# Altium PCB PCB.PcbDoc (part 1 of 2)
Units mm, origin at the board's own origin, x right, y up, seen from the top; angles counter-clockwise.
Board outline 117.79 x 36.02 mm, 4 copper layers (Top Layer, Layer 1, Layer 2, Bottom Layer), stack 1.592 mm thick; 89 components, 67 nets, 364 pads, 204 vias.
Unrouted connection lines stored in the file: 24.
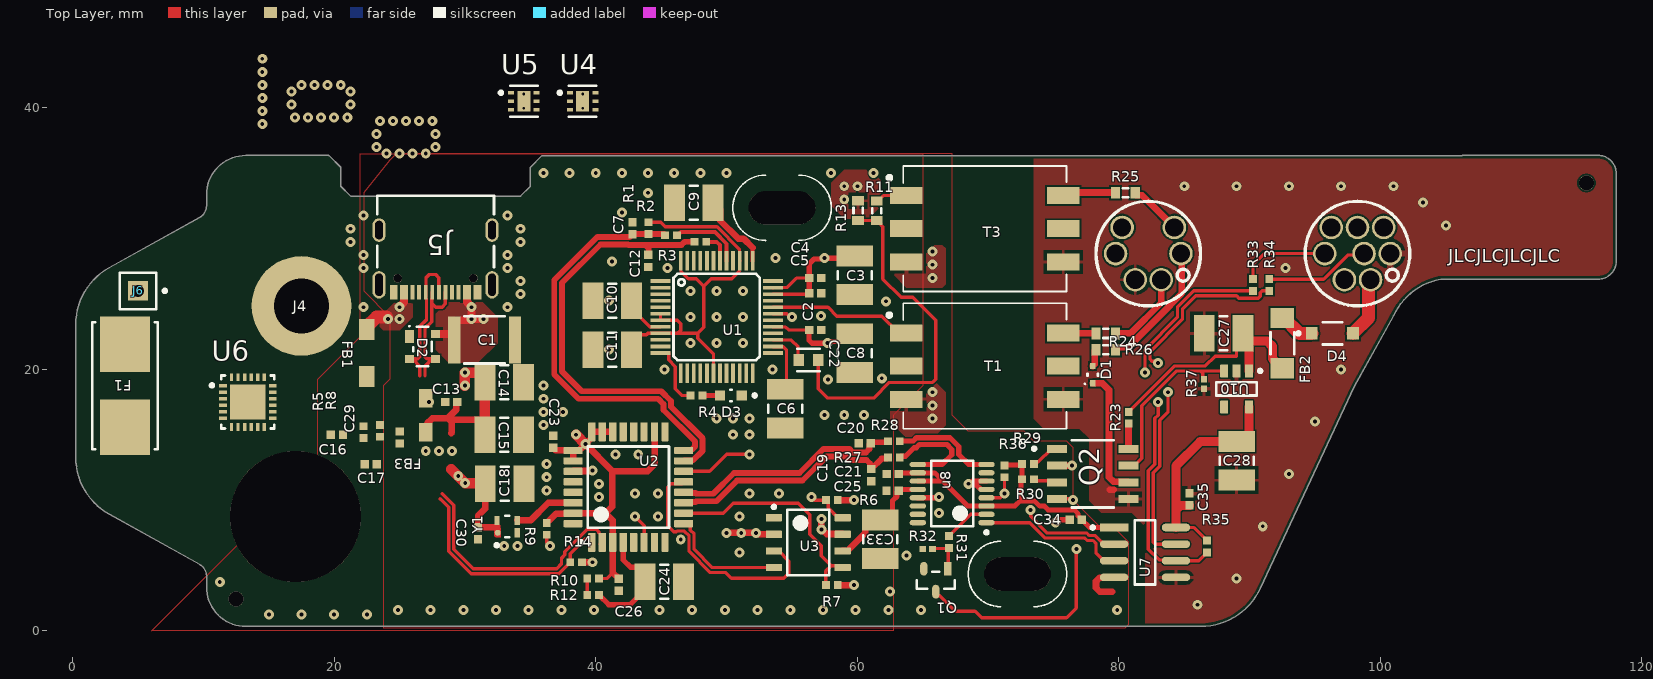
[diagram p0: Top Layer view]
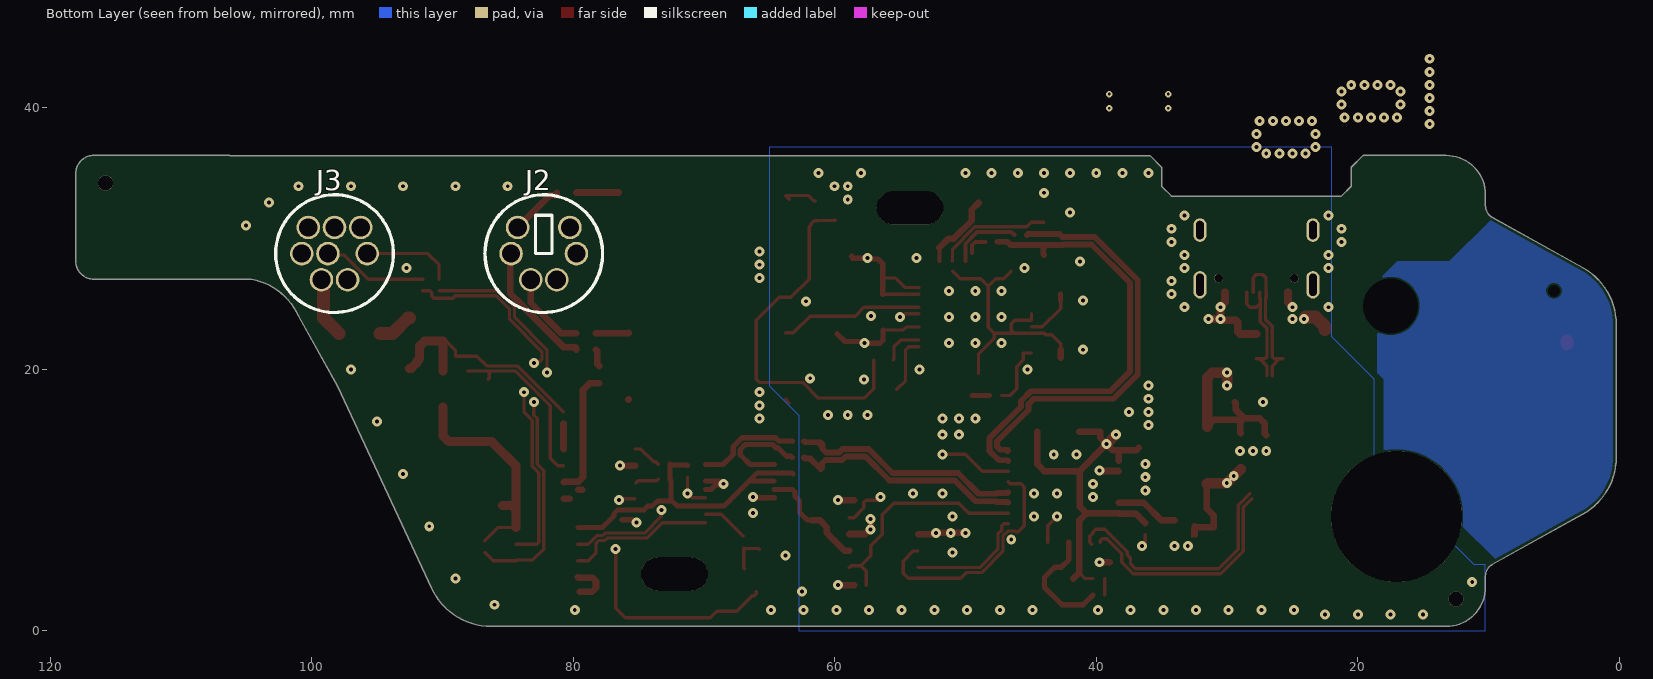
[diagram p1: Bottom Layer view, seen from below]
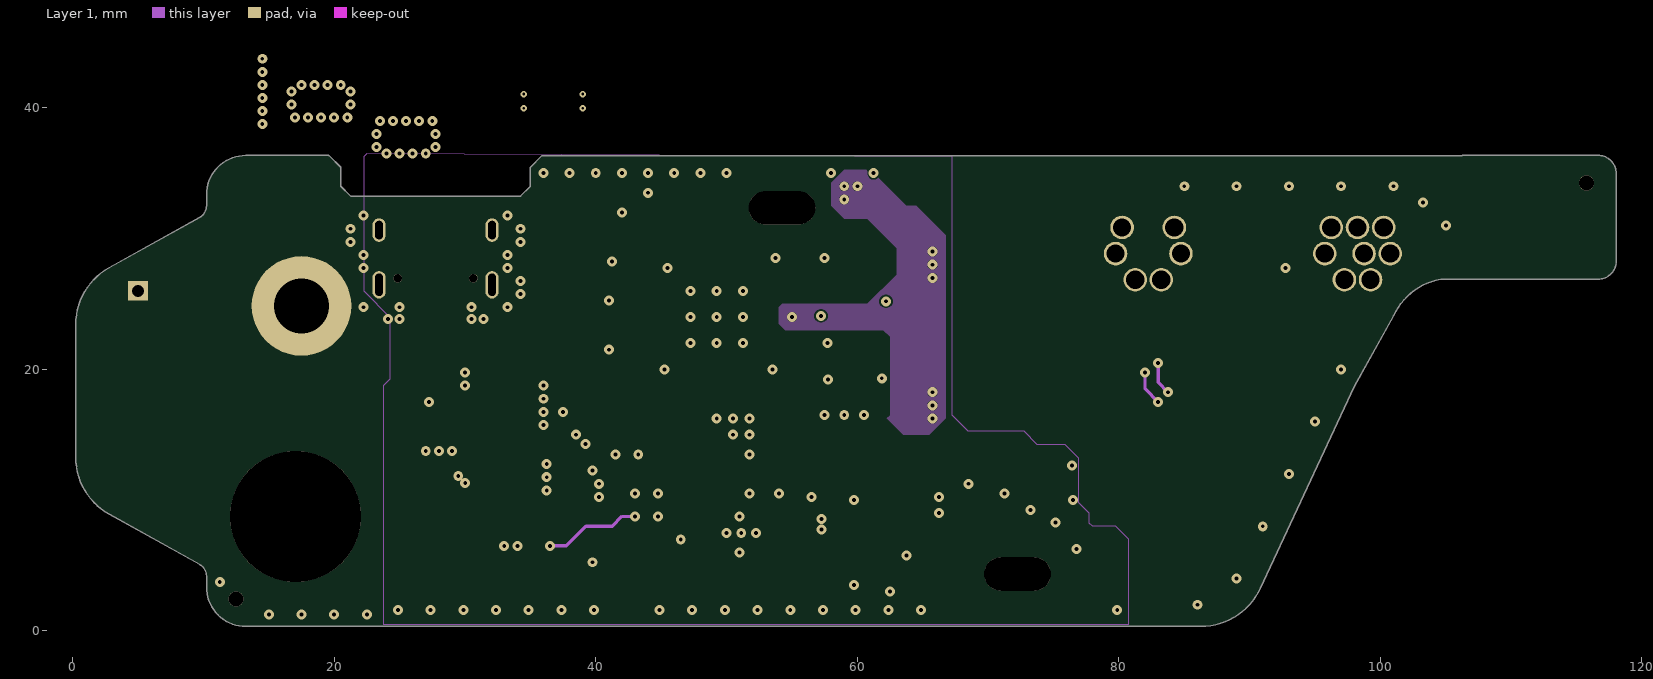
[diagram p2: Layer 1]
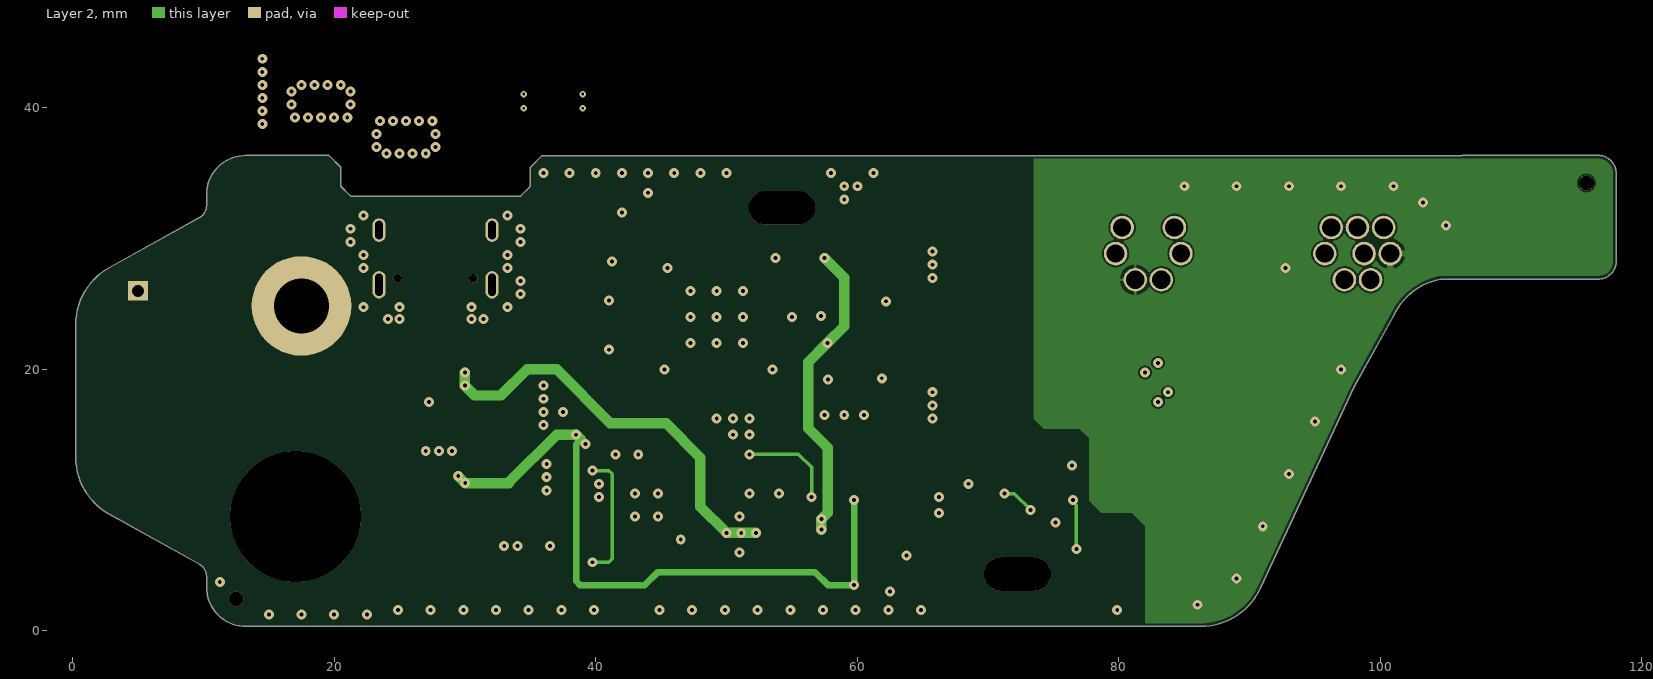
[diagram p3: Layer 2]
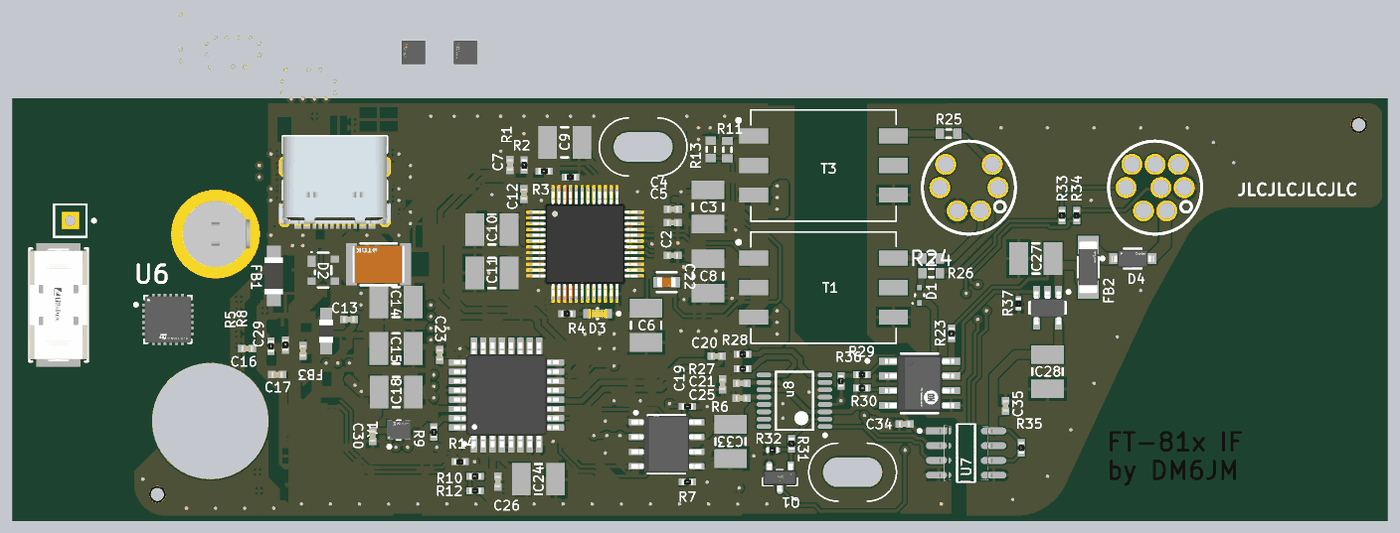
[diagram p5: 3D render of the assembled board from above, using the file's embedded part models]

## Layer stack, top to bottom
Top Solder: solder mask 0.0102, Solder Resist, Dk 3.5
Top Layer: signal copper 0.0356
PregHigher (7628*1): prepreg 0.2104, PP-006, Dk 4.4
Layer 1: signal copper 0.0175
Core: dielectric 1.065, FR-4, Dk 4.6
Layer 2: signal copper 0.0175
PregLower (7628*1): prepreg 0.2104, PP-006, Dk 4.4
Bottom Layer: signal copper 0.0356
Bottom Solder: solder mask 0.0102, Solder Resist, Dk 3.5

## Board outline
2.813,8.916 cw(c5.245,13.293) 0.238,13.293 0.238,23.409 cw(c5.245,23.409) 2.813,27.785 9.727,31.626 ccw(c9.245,32.495) 10.238,32.495 10.238,33.351 cw(c13.245,33.351) 13.245,36.357 19.601,36.357 19.601,36.351 20.5,35.451 20.5,34 21.25,33.25 34.25,33.25 35,34 35,35.451 35.899,36.351 106.245,36.351 106.251,36.357 116.643,36.357 116.643,36.364 cw(c116.643,34.983) 118.024,34.983 118.024,28.274 118.031,28.274 cw(c116.65,28.274) 116.65,26.893 104.607,26.893 ccw(c105.522,21.984) 100.996,24.094 98.002,18.675 98.008,18.672 90.81,3.235 cw(c86.272,5.351) 86.272,0.344 13.245,0.344 cw(c13.245,3.351) 10.238,3.351 10.238,4.207 ccw(c9.244,4.207) 9.727,5.075

## Design rules (kind name [scope] priority, off if disabled: settings)
BoardOutlineClearance [All] p1: gap=0.254 ignorepadtopadclearanceinfootprint=FALSE
Clearance [All] p1: gap=0.127 ignorepadtopadclearanceinfootprint=TRUE
DiffPairsRouting [InDifferentialPair('USB_EXT_D') or InDifferentialPair('USB_D')] p1: maxlimit=0.127 minlimit=0.127 mostfreqgap=0.127 toplayer_minwidth=0.261 toplayer_maxwidth=0.261 toplayer_prefwidth=0.206 midlayer1_minwidth=0.381 midlayer1_maxwidth=0.381 midlayer1_prefwidth=0.139 midlayer2_minwidth=0.381 midlayer2_maxwidth=0.381 midlayer2_prefwidth=0.139 bottomlayer_minwidth=0.261 bottomlayer_maxwidth=0.261 bottomlayer_prefwidth=0.206 impedanceprofiledriven=TRUE impedanceprofileid={2149D75C-B108-4435-8009-75143161DC46} impedanceprofilevalue=90.000000 maxuncoupledlength=12.7
DiffPairsRouting DiffPairsRouting_USB [InDifferentialPair('USB_1_D') or InDifferentialPair('USB_2_D')] p2: maxlimit=0.127 minlimit=0.127 mostfreqgap=0.127 toplayer_minwidth=0.447 toplayer_maxwidth=0.447 toplayer_prefwidth=0.244 midlayer1_minwidth=0.381 midlayer1_maxwidth=0.381 midlayer1_prefwidth=0.147 midlayer2_minwidth=0.381 midlayer2_maxwidth=0.381 midlayer2_prefwidth=0.147 bottomlayer_minwidth=0.447 bottomlayer_maxwidth=0.447 bottomlayer_prefwidth=0.244 impedanceprofiledriven=TRUE impedanceprofileid={BB3B1409-5E5B-4417-8D99-8DCBF621B1B4} impedanceprofilevalue=90.000000 maxuncoupledlength=12.7
HoleSize [All] p1: absolutevalues=TRUE maxlimit=25.4 minlimit=0.254 maxpercent=80.000 minpercent=20.000
MinimumSolderMaskSliver [All] p1: minsoldermaskwidth=0.102
PolygonConnect [All And ( Not (IsVia)) vs All And ( Not (IsVia))] p1: connectstyle=Relief reliefconductorwidth=0.254 reliefentries=4 polygonreliefangle="90 Angle" airgapwidth=0.254
RoutingVias [All] p1: holewidth=0.711 width=1.27 viastyle="Through Hole" minholewidth=0.711 minwidth=1.27 maxholewidth=0.711 maxwidth=1.27
SolderMaskExpansion [not IsVia] p1: expansion=0.102 istentingtop=FALSE
SolderMaskExpansion SolderMaskExpansion_Via [IsVia] p2: expansion=0 istentingtop=TRUE
Width Width_USB_Pwr [InNetClass('USB_Pwr')] p1: maxlimit=1 minlimit=0.254 preferedwidth=0.508
Width [All] p2: maxlimit=1 minlimit=0.254 preferedwidth=0.254
27 further rules are at their usual default settings.

## Classes and differential pairs
component class Power: F1 J4 J6 U6
component class Serial: C19 C20 C21 C25 C27 C28 C33 C34 C35 D1 D4 FB2 J3 Q1 Q2 R23 R26 R27 R28 R29 R30 R31 R32 R33 R34 R35 R36 R37 U7 u8 U10
component class USB: C1 C13 C14 C15 C16 C17 C18 C23 C24 C26 C29 C30 D2 FB1 FB3 J5 R5 R6 R7 R8 R9 R10 R12 R14 U2 U3 U4 U5 Y1
net class USB_Pwr: NetC1_2 NetC13_1 USB_3V3 VBUS1 VBUS2
net class USB_Diff: USB_1_D_N USB_1_D_P USB_2_D_N USB_2_D_P USB_D_N USB_D_P USB_EXT_D_N USB_EXT_D_P
component class Sound: C2 C3 C4 C5 C6 C7 C8 C9 C10 C11 C12 C22 D3 J2 R1 R2 R3 R4 R11 R13 R24 R25 T1 T3 U1
differential pair USB_D: +USB_D_P -USB_D_N
differential pair USB_2_D: +USB_2_D_P -USB_2_D_N
differential pair USB_1_D: +USB_1_D_P -USB_1_D_N
differential pair USB_EXT_D: +USB_EXT_D_P -USB_EXT_D_N

## Components (designator, comment, footprint, x,y, rotation, side; value= is the part's Value field where it differs from the comment)
C1 "C4532X7R3A103K200KA" FP-C4532-200-0_4-IPC_B 31.5,22.25 r180 top
C2 "100nF/50V" TORQ-CAP-0402_N 56.773,23.009 r0 top value=100nF
C3 "4.7uF 25V" CAPC1210(3225)220_M 59.817,27.187 r90 top value=4.7uF
C4 "100nF/50V" TORQ-CAP-0402_N 56.792,26.98 r0 top value=100nF
C5 "100nF/50V" TORQ-CAP-0402_N 56.779,25.829 r0 top value=100nF
C6 "4.7uF 25V" CAPC1210(3225)220_M 54.5,17 r90 top value=4.7uF
C7 "47pF/50V" TORQ-CAP-0402_N 42.806,30.8 r270 top value=47p
C8 "4.7uF 25V" CAPC1210(3225)220_M 59.817,21.246 r90 top value=4.7uF
C9 "4.7uF 25V" CAPC1210(3225)220_M 47.5,32.75 r180 top value=4.7uF
C10 "4.7uF 25V" CAPC1210(3225)220_M 41.25,25.25 r0 top value=4.7uF
C11 "4.7uF 25V" CAPC1210(3225)220_M 41.25,21.5 r0 top value=4.7uF
C12 "47pF/50V" TORQ-CAP-0402_N 44,28.29 r90 top value=47p
C13 "100nF/50V" TORQ-CAP-0402_N 28.96,17.5 r180 top value=100nF
C14 "4.7uF 25V" CAPC1210(3225)220_M 33,19 r180 top value=4.7uF
C15 "4.7uF 25V" CAPC1210(3225)220_M 33,15 r180 top value=4.7uF
C16 "47pF/50V" TORQ-CAP-0402_N 20.21,15 r180 top value=47p
C17 "47pF/50V" TORQ-CAP-0402_N 22.79,12.75 r0 top value=47p
C18 "4.7uF 25V" CAPC1210(3225)220_M 33.025,11.25 r180 top value=4.7uF
C19 "47pF/50V" TORQ-CAP-0402_N 61.06,11.915 r90 top value=47p
C20 "47pF/50V" TORQ-CAP-0402_N 60.557,14.336 r0 top value=47p
C21 "100nF/50V" TORQ-CAP-0402_N 62.71,12 r0 top value=100nF
C22 "CC0603KRX7R9BB105" FP-CC0603-DB-MFG 56.262,20.714 r180 top
C23 "100nF/50V" TORQ-CAP-0402_N 36.75,14.46 r90 top value=100nF
C24 "4.7uF 25V" CAPC1210(3225)220_M 45.25,3.75 r180 top value=4.7uF
C25 "100nF/50V" TORQ-CAP-0402_N 62.695,10.722 r0 top value=100nF
C26 "100nF/50V" TORQ-CAP-0402_N 41.75,3.54 r270 top value=100nF
C27 "4.7uF 25V" CAPC1210(3225)220_M 88,22.75 r180 top value=4.7uF
C28 "4.7uF 25V" CAPC1210(3225)220_M 89,13 r270 top value=4.7uF
C29 "100nF/50V" TORQ-CAP-0402_N 25,14.79 r270 top value=100nF
C30 "100nF/50V" TORQ-CAP-0402_N 31,7.46 r270 top value=100nF
C33 "4.7uF 25V" CAPC1210(3225)220_M 61.75,7 r270 top value=4.7uF
C34 "100nF/50V" TORQ-CAP-0402_N 76.71,8.5 r180 top value=100nF
C35 "100nF/50V" TORQ-CAP-0402_N 85.4,10.058 r90 top value=100nF
D1 "BAT54XV2T5G" ONSC-SOD-523-2-502-01_V 78,19.59 r90 top
D2 "PRTR5V0U2X,215" NXP-SOT143B-4_V 26.75,21.75 r0 top
D3 "APT1608LZGCK" FP-APT1608LZGCK-MFG 50.325,18 r180 top
D4 "MBR0580S1-7" FP-SOD123-MFG 96.325,22.75 r0 top value=15pF
F1 "0154004.DR" FP-0154-MFG 4,18.75 r270 top
FB1 "74279221111" WE-MPSB_1206_L3.2W1.6H1.1 22.5,21.25 r270 top
FB2 "BLM41PG600SN1L" FP-BLM41-0_2-IPC_B 92.5,22 r90 top
FB3 "74279220601" WE-MPSB_0805_L2W1.2H0.9 27,16.5 r270 top
J2 "MP-371/S6" MiniDIN6_TopSolder_Lumberg 82.245,28.851 r180 bottom locked
J3 "MP-371/S8" MiniDIN8_TopSolder_Lumberg 98.245,28.851 r180 bottom locked
J4 "50-00621_THT" 50-00621_THT 17.495,24.851 r0 top locked
J5 "629722000214" 629722000214 27.75,29.5 r180 top
J6 "Inner" PIN1 5,26 r270 top
Q1 "BSS123-7-F" FP-SOT23-IPC_C 66,3.877 r270 top
Q2 "MOCD223M" FP-751DZ-MFG 78,12 r0 top
R1 "1kR5" TORQ-RES-0402-N 44.025,30.792 r90 top value=1k5
R2 "27R" TORQ-RES-0402-N 45.75,30.25 r0 top value=27
R3 "27R" TORQ-RES-0402-N 48,29.75 r0 top value=27
R4 "330R" TORQ-RES-0402-N 47.7,18 r0 top value=330
R5 "27R" TORQ-RES-0402-N 22.25,15.2 r270 top value=27
R6 "10kR" TORQ-RES-0402-N 58.05,10 r180 top value=10k
R7 "10kR" TORQ-RES-0402-N 58.05,3.5 r180 top value=10k
R8 "27R" TORQ-RES-0402-N 23.5,15.3 r270 top value=27
R9 "10kR" TORQ-RES-0402-N 36.25,7.8 r90 top value=10k
R10 "1kR5" TORQ-RES-0402-N 39.8,4 r180 top value=1k5
R11 "470R" J1-0603 61.481,32.121 r90 top
R12 "1kR5" TORQ-RES-0402-N 39.8,2.75 r0 top value=1k5
R13 "100R" J1-0603 60.06,32.141 r90 top
R14 "1kR5" TORQ-RES-0402-N 38.5,5.25 r180 top value=1k5
R23 "1kR" TORQ-RES-0402-N 80.75,16.3 r90 top value=1k
R24 "27R" J1-0603 79,22.75 r0 top
R25 "27R" J1-0603 80.5,33.5 r0 top
R26 "100R" J1-0603 79,21.5 r0 top
R27 "27R" TORQ-RES-0402-N 62.8,13.25 r0 top value=27
R28 "27R" TORQ-RES-0402-N 62.8,14.5 r0 top value=27
R29 "1kR" TORQ-RES-0402-N 73.05,12.75 r0 top value=1k
R30 "1kR" TORQ-RES-0402-N 73.053,11.593 r180 top value=1k
R31 "1kR" TORQ-RES-0402-N 67,6.8 r90 top value=1k
R32 "100K/5%" TORQ-RES-0402_L 65.375,6.25 r0 top value=100k
R33 "100R" TORQ-RES-0402-N 90.25,26.45 r90 top value=100
R34 "100R" TORQ-RES-0402-N 91.5,26.45 r90 top value=100
R35 "10kR" TORQ-RES-0402-N 86.75,6.45 r90 top value=10k
R36 "10kR" TORQ-RES-0402-N 71.25,12.2 r90 top value=10k
R37 "100K/5%" TORQ-RES-0402_L 86.5,18.875 r90 top value=100k
T1 "TTC-5023" TRANSFORMER_TTC-5023 69.75,20.25 r0 top
T3 "TTC-5023" TRANSFORMER_TTC-5023 69.75,30.75 r0 top
U1 "CM108B" TQFP48 49.25,24 r90 top
U2 "TUSB2036VF" VF0032A_N 42.5,11 r90 top
U3 "TPS2046BDR" D0008A_L 56.25,6.75 r0 top
U4 "TPS70950DRVT" FP-DRV0006A-MFG 39,40.5 r0 top
U5 "TPS70933DRVT" FP-DRV0006A-MFG 34.5,40.5 r0 top
U6 "STUSB4500QTR" FP-QFN-24-EP_4x4-MFG 13.4,17.5 r0 top
U7 "ISO7021D" FP-D0008A-IPC_B 82,6 r0 top
u8 "FT230XS" FTDI-SSOP-16_L 67.25,10.5 r180 top
U10 "TPS76333DBVT" DBV0005A_N 89,18.5 r270 top
Y1 "DSC6101MI2B-048.0000" FP-C04-C04-1200-0 33.225,7.975 r0 top

## Footprints (in the part's own frame and the unit in brackets; to place one, negate y for a bottom-side part, rotate by r counter-clockwise, add the part's x,y. Pads: shape width x height; smd on the part's side, far side on the other; paste and mask are expansions set on the pad)
50-00621_THT [mm] "Connector, dc plug, 4.0x1.7x21.3 mm, mounted as THT"
  round 7.62 / inner round 7.62 / far side round 0 hole 4.2: 1(0,0)
  body extent -2.85,-2.85 2.95,2.85, height 10.46
629722000214 [mm] "USB TYPE C VERTICAL PLUG"
  rect 0.6x1.14 smd: A1/B12(-3.2,3.605) A4/B9(-2.4,3.605) A9/B4(2.4,3.605) A12/B1(3.2,3.605)
  rect 0.3x1.14 smd: A5(-1.25,3.605) A6(-0.25,3.605) A7(0.25,3.605) A8(1.25,3.605) B5(1.75,3.605) B6(0.75,3.605) B7(-0.75,3.605) B8(-1.75,3.605)
  round 0.65 hole 0.65 unplated: MH1(-2.89,2.535) MH2(2.89,2.535)
  oval 1x2.1 hole 0.6 slot 1.7 at 90 deg: Shell(-4.32,3.035) Shell(4.32,3.035)
  oval 1x1.8 hole 0.6 slot 1.4 at 90 deg: Shell(-4.32,-1.145) Shell(4.32,-1.145)
  silkscreen extent -4.47,-3.76 4.47,1.7, body extent -4.79,-3.76 4.79,3.95, height 3.33
CAPC1210(3225)220_M [mm] "Chip Capacitor, Body 3.2x2.5mm, Height 2.2mm, IPC Low Density"
  rect 1.6x2.8 smd: 1(-1.475,0) 2(1.475,0)
  silkscreen extent -0.3,-1.3 0.3,1.3, body extent -1.7,-1.35 1.7,1.35, height 2.2
D0008A_L [mm] "SOIC, 8-Leads, Body 5x4mm, Pitch 1.27mm, IPC High Density"
  rrect18% 1.25x0.55 smd: 1(-2.625,1.905) 2(-2.625,0.635) 3(-2.625,-0.635) 4(-2.625,-1.905) 5(2.625,-1.905) 6(2.625,-0.635) 7(2.625,0.635) 8(2.625,1.905)
  silkscreen extent -2.75,-2.5 1.6,2.85, body extent -3,-2.45 3,2.45, height 1.63
DBV0005A_N [mm] "SOT23, 5-Leads, Body 3.05x1.75mm, Pitch 0.95mm, IPC Medium Density"
  rrect17% 1x0.6 smd: 1(-1.375,0.95) 2(-1.375,0) 3(-1.375,-0.95) 4(1.375,-0.95) 5(1.375,0.95)
  silkscreen extent -1.5,-1.55 0.5,1.93, body extent -1.42,-1.46 1.42,1.46, height 1.08
FP-0154-MFG [mm]
  rect 4.24x3.81 smd paste+0 mask+0: 1(-3.185,0) 2(3.185,0)
  silkscreen extent -4.86,-2.51 4.86,2.51, body extent -5.41,-2.62 5.41,2.62, height 0.25
FP-751DZ-MFG [mm]
  rect 1.52x0.61 smd paste+0 mask+0: 1(-2.73,1.905) 2(-2.73,0.635) 3(-2.73,-0.635) 4(-2.73,-1.905) 5(2.73,-1.905) 6(2.73,-0.635) 7(2.73,0.635) 8(2.73,1.905)
  silkscreen extent -4.6,-2.57 1.6,2.57, body extent -3.59,-2.67 3.59,2.67, height 0.25
FP-APT1608LZGCK-MFG [mm]
  rect 0.8x0.8 smd paste+0 mask+0: 1(-0.825,0) 2(0.825,0)
  silkscreen extent -1.95,-0.45 0.05,0.45, body extent -1.33,-0.55 1.33,0.55, height 0.25
FP-BLM41-0_2-IPC_B [mm]
  rect 1.554x1.806 smd paste+0 mask+0: 1(-1.926,0) 2(1.926,0)
  silkscreen extent -0.85,-0.9 0.85,0.9, body extent -2.95,-1.15 2.95,1.15, height 0.25
FP-C04-C04-1200-0 [mm]
  round 0.45 smd paste+0 mask+0: 1(-0.725,-0.475)
  rect 0.4x0.7 smd paste+0 mask+0: 2(0.775,-0.475) 3(0.775,0.475) 4(-0.775,0.475)
  Top Layer region: -0.975,-0.125 -0.475,-0.125 -0.475,-0.825 -0.883,-0.825 -0.975,-0.733
  silkscreen extent -0.92,-1.55 0.15,0.82, body extent -1.53,-1.33 1.53,1.33, height 0.25
FP-C4532-200-0_4-IPC_B [mm]
  rect 0.953x3.603 smd paste+0 mask+0: 1(-2.325,0) 2(2.325,0)
  silkscreen extent -1.55,-1.8 1.55,1.8, body extent -3.05,-2.05 3.05,2.05, height 0.25
FP-CC0603-DB-MFG [mm]
  rect 0.8x0.9 smd paste+0 mask+0: 1(-0.75,0) 2(0.75,0)
  silkscreen extent -0.85,-0.85 0.85,0.85, body extent -1.43,-0.82 1.43,0.82, height 0.25
FP-D0008A-IPC_B [mm]
  rect 2.169x0.582 smd paste+0 mask+0: 1(-2.364,1.905)
  rrect100% 2.169x0.582 smd paste+0 mask+0: 2(-2.364,0.635) 3(-2.364,-0.635) 4(-2.364,-1.905) 5(2.364,-1.905) 6(2.364,-0.635) 7(2.364,0.635) 8(2.364,1.905)
  silkscreen extent -4.12,-2.45 0.78,2.45, body extent -3.7,-2.7 3.7,2.7, height 0.25
FP-DRV0006A-MFG [mm]
  rrect33% 0.45x0.3 smd paste+0 mask+0: 1(-0.975,0.65) 2(-0.975,0) 3(-0.975,-0.65) 4(0.975,-0.65) 5(0.975,0) 6(0.975,0.65)
  rrect10% 1x1.6 smd paste-1000 mask+0: 7(0,0)
  silkscreen extent -1.87,-1.17 1.05,1.17, body extent -1.3,-1.15 1.3,1.15, height 0.25
FP-QFN-24-EP_4x4-MFG [mm]
  rect 0.6x0.25 smd paste+0 mask+0: 1(-1.9,1.25) 2(-1.9,0.75) 3(-1.9,0.25) 4(-1.9,-0.25) 5(-1.9,-0.75) 6(-1.9,-1.25) 13(1.9,-1.25) 14(1.9,-0.75) 15(1.9,-0.25) 16(1.9,0.25) 17(1.9,0.75) 18(1.9,1.25)
  rect 0.25x0.6 smd paste+0 mask+0: 7(-1.25,-1.9) 8(-0.75,-1.9) 9(-0.25,-1.9) 10(0.25,-1.9) 11(0.75,-1.9) 12(1.25,-1.9) 19(1.25,1.9) 20(0.75,1.9) 21(0.25,1.9) 22(-0.25,1.9) 23(-0.75,1.9) 24(-1.25,1.9)
  rect 2.7x2.7 smd paste+0 mask+0: 25(0,0)
  silkscreen extent -2.87,-2.02 2.02,2.02, body extent -2.3,-2.3 2.3,2.3, height 0.25
FP-SOD123-MFG [mm]
  rect 0.9x0.95 smd paste+0 mask+0: 1(-1.575,0) 2(1.575,0)
  silkscreen extent -2.72,-0.85 0.75,0.85, body extent -2.12,-0.95 2.12,0.95, height 0.25
FP-SOT23-IPC_C [mm]
  rect 1.059x0.547 smd paste+0 mask+0: 1(-0.877,0.915)
  rrect100% 1.059x0.547 smd paste+0 mask+0: 2(-0.877,-0.915) 3(0.877,0)
  silkscreen extent -0.65,-1.45 0.65,1.45, body extent -1.51,-1.55 1.51,1.55, height 0.25
FTDI-SSOP-16_L [mm] "SOP, 16-Leads, Body 5x4mm, Pitch 0.635mm, IPC High Density"
  oval 1.25x0.4 smd: 1(-2.625,2.222) 2(-2.625,1.587) 3(-2.625,0.952) 4(-2.625,0.317) 5(-2.625,-0.318) 6(-2.625,-0.953) 7(-2.625,-1.588) 8(-2.625,-2.223) 9(2.625,-2.222) 10(2.625,-1.587) 11(2.625,-0.952) 12(2.625,-0.317) 13(2.625,0.318) 14(2.625,0.953) 15(2.625,1.588) 16(2.625,2.223)
  silkscreen extent -2.75,-2.5 1.6,3.1, body extent -2,-2.5 2,2.5, height 1.76
J1-0603 [mm] "Chip Resistor, Body 1.6x0.8mm, IPC High Density"
  rect 0.7x0.9 smd: 1(-0.75,0) 2(0.75,0)
  silkscreen extent -0.2,-0.35 0.2,0.35, body extent -0.85,-0.48 0.85,0.48, height 0.9
MiniDIN6_TopSolder_Lumberg [mm] "Inner part of a lumberg MP-371 connector soldered directly on PCB"
  round 1.8 hole 1.4: 1(-1,-2) 2(1,-2) 3(-2.5,0) 4(2.5,0) 5(-2,2) 6(2,2)
  silkscreen extent -4.5,-4.5 4.5,4.5, body extent -4.5,-4.5 4.5,4.5, height 5
MiniDIN8_TopSolder_Lumberg [mm] "Inner part of a lumberg MP-371 connector soldered directly on PCB"
  round 1.8 hole 1.4: 1(-1,-2) 2(1,-2) 3(-2.5,0) 4(-0.5,0) 5(2.5,0) 6(-2,2) 7(0,2) 8(2,2)
  silkscreen extent -4.5,-4.5 4.5,4.5, body extent -4.5,-4.5 4.5,4.5, height 5
NXP-SOT143B-4_V [mm] "SOT143, 4-Leads, Body 3x1.4mm"
  rect 0.7x1 smd: 1(-1,0.75)
  rect 0.7x0.6 smd: 2(-1,-0.95) 3(1,-0.95) 4(1,0.95)
  silkscreen extent -1.05,-1.5 0.7,1.6, body extent -0.7,-1.5 0.7,1.5, height 1.1
ONSC-SOD-523-2-502-01_V [mm] "SOD, 2-Leads, Body 1.2x0.8mm"
  rect 0.48x0.4 smd: 1(-0.66,0) 2(0.66,0)
  silkscreen extent -0.75,-0.4 0.07,0.65, body extent -0.6,-0.4 0.6,0.4, height 0.7
PIN1 [mm] "Connector; Plug"
  rect 1.5x1.5 / inner rect 1.5x1.5 / far side rect 0x0 hole 0.9: 1(0,0)
  silkscreen extent -1.4,-1.4 1.4,2.18
TORQ-CAP-0402_N [mm] "Chip Capacitor, 2-Leads, Body 1.00x0.50mm, IPC Medium Density"
  rect 0.64x0.64 smd: 1(-0.46,0) 2(0.46,0)
  body extent -0.5,-0.25 0.5,0.25, height 0.5
TORQ-RES-0402-N [mm] "Resistor - 0402 - 2-Leads - Body 1.00x0.50mm - Medium Density"
  rect 0.6x0.6 smd: 1(-0.45,0) 2(0.45,0)
  body extent -0.5,-0.25 0.5,0.25, height 0.35
TORQ-RES-0402_L [mm] "Chip Resistor, 2-Leads, Body 1.00x0.50mm, IPC High Density"
  rect 0.5x0.45 smd: 1(-0.375,0) 2(0.375,0)
  body extent -0.5,-0.25 0.5,0.25, height 0.35
TQFP48 [mm]
  rect 0.28x1.5 smd paste-2: 1(2.75,4.3) 2(2.25,4.3) 3(1.75,4.3) 4(1.25,4.3) 5(0.75,4.3) 6(0.25,4.3) 7(-0.25,4.3) 8(-0.75,4.3) 9(-1.25,4.3) 10(-1.75,4.3) 11(-2.25,4.3) 12(-2.75,4.3) 25(-2.75,-4.3) 26(-2.25,-4.3) 27(-1.75,-4.3) 28(-1.25,-4.3) 29(-0.75,-4.3) 30(-0.25,-4.3) 31(0.25,-4.3) 32(0.75,-4.3) 33(1.25,-4.3) 34(1.75,-4.3) 35(2.25,-4.3) 36(2.75,-4.3)
  rect 1.5x0.28 smd paste-2: 13(-4.3,2.75) 14(-4.3,2.25) 15(-4.3,1.75) 16(-4.3,1.25) 17(-4.3,0.75) 18(-4.3,0.25) 19(-4.3,-0.25) 20(-4.3,-0.75) 21(-4.3,-1.25) 22(-4.3,-1.75) 23(-4.3,-2.25) 24(-4.3,-2.75) 37(4.3,-2.75) 38(4.3,-2.25) 39(4.3,-1.75) 40(4.3,-1.25) 41(4.3,-0.75) 42(4.3,-0.25) 43(4.3,0.25) 44(4.3,0.75) 45(4.3,1.25) 46(4.3,1.75) 47(4.3,2.25) 48(4.3,2.75)
  silkscreen extent -3.3,-3.3 3.3,3.3, body extent -4.5,-4.5 4.5,4.5, height 1.5
TRANSFORMER_TTC-5023 [mm]
  rect 2.5x1.3 smd: 1(-6,2.54) 2(-6,0) 3(-6,-2.54) 4(6,-2.54) 5(6,0) 6(6,2.54)
  silkscreen extent -7.44,-4.8 6.25,4.8, body extent -6.25,-4.8 6.25,4.8, height 7.6
VF0032A_N [mm] "QFP, 32-Leads, Body 7x7mm, Pitch 0.8mm, IPC Medium Density"
  rrect18% 1.45x0.55 smd: 1(-4.225,2.8) 2(-4.225,2) 3(-4.225,1.2) 4(-4.225,0.4) 5(-4.225,-0.4) 6(-4.225,-1.2) 7(-4.225,-2) 8(-4.225,-2.8) 17(4.225,-2.8) 18(4.225,-2) 19(4.225,-1.2) 20(4.225,-0.4) 21(4.225,0.4) 22(4.225,1.2) 23(4.225,2) 24(4.225,2.8)
  rrect18% 0.55x1.45 smd: 9(-2.8,-4.225) 10(-2,-4.225) 11(-1.2,-4.225) 12(-0.4,-4.225) 13(0.4,-4.225) 14(1.2,-4.225) 15(2,-4.225) 16(2.8,-4.225) 25(2.8,4.225) 26(2,4.225) 27(1.2,4.225) 28(0.4,4.225) 29(-0.4,4.225) 30(-1.2,4.225) 31(-2,4.225) 32(-2.8,4.225)
  silkscreen extent -4.35,-3.1 3.1,3.75, body extent -4.51,-4.51 4.51,4.51, height 1.6
WE-MPSB_0805_L2W1.2H0.9 [mm] "SMD EMI Multilayer Power Suppression Bead, body 2.00x1.20mm"
  rect 1.4x1 smd: 1(-1.3,0) 2(1.3,0)
  body extent -1,-0.6 1,0.6, height 0.9
WE-MPSB_1206_L3.2W1.6H1.1 [mm] "SMD EMI Multilayer Power Suppression Bead, body 3.20x1.60mm"
  rect 1.6x1.2 smd: 1(-1.8,0) 2(1.8,0)
  body extent -1.6,-0.8 1.6,0.8, height 1.1

## Part data
C1: library part CMP-08246-006993-1, "Multilayer Ceramic Capacitors 10nF ±10% 1000V X7R SMD 1812", Capacitance=10nF, Case Code (Imperial)=1812, Case Code (Metric)=4532, Dielectric=X7R, JLCPCBPartNum=C577346, Max Operating Temperature=125°C, Min Operating Temperature=-55°C, Package Quantity=1, Resistor Type=Ceramic, Tolerance=10%, Voltage Rating=1kV, Case/Package=1812, Depth=3.2mm, Lead Free="Lead Free", Length=4.5mm, Mount="Surface Mount", Number of Pins=2, Packaging="Tape and Reel", REACH SVHC="No SVHC", RoHS Compliant=Yes, Series=C, Termination=SMD/SMT, Thickness=0.087inch, Voltage Rating (DC)=1kV, Weight=0.000952oz, Width=0.126inch
C2 C4 C5 C13 C21 C23 C25 C26 C29 C30 C34 C35: library part CMP-001-00105-22, "Capacity - 100nF - 50V - X7R - 10% - 0402 - -40°C to 125°C", JLCPCBPartNum=C432917, Man-.Bonding=No
C3 C6 C8 C9 C10 C11 C14 C15 C18 C24 C27 C28 C33: library part CMP-1038-02151-2, "CAP 4.7uF 25V ±10% 1210 (3225 Metric) Thickness 2.2mm SMD", Case-EIA=1210, Case-Metric=3225, JLCPCBPartNum=C86052, Rated Voltage="25 V", Tolerance=Â±10%, Max Thickness="2.2 mm", Technology=SMT
C7 C12 C16 C17 C19 C20: library part CMP-001-00105-22, "Capacity - 47pF - 50V - NP0 - 1% - 0402 - -40°C to 125°C", JLCPCBPartNum=C277503, Man-.Bonding=No
C22: library part CMP-03422-000761-2, "CAP CER 1UF 50V X7R 0603", Capacitance=1uF, Case Code (Imperial)=0603, Case Code (Metric)=1608, Dielectric=X7R, JLCPCBPartNum=C559769, Max Operating Temperature=125°C, Min Operating Temperature=-55°C, Package Quantity=4000, Resistor Type=Ceramic, Tolerance=10%, Voltage Rating=50V, Case/Package=0603, Halogen Free="Halogen Free", Lead Free="Lead Free", Length=0.063inch, Mount="Surface Mount", Packaging="Tape and Reel", Termination=SMD/SMT, Thickness=0.035inch, Voltage Rating (DC)=50V, Weight=7.1E-05oz, Width=0.031inch
D1: library part CMP-1055-00490-1, "Schottky Barrier Diode, 2-Pin SOD-523, Pb-Free, Tape and Reel", JLCPCBPartNum=C146759, Manufacturer="On Semiconductor", ComponentLink1Description="Manufacturer URL", ComponentLink1URL=http://www.onsemi.com/, ComponentLink2Description=Datasheet, ComponentLink2URL=http://www.onsemi.cn/pub_link/Collateral/BAT54XV2T1-D.PDF, ComponentLink3Description="Package Specification", ComponentLink3URL=http://www.onsemi.com/pub_link/Collateral/502-01.PDF, Configuration=Single, DatasheetVersion="Rev. 8", IFSM Max (A)=0.6, Mounting Technology="Surface Mount", PackageDescription="2-Pin SOD, Body 1.2 x 0.8 mm", PackageReference=SOD-523-2-502-01, PackageVersion="Rev. E, 09/2010", Packing="Tape and Reel", PartNumber=BAT54XV2T5G, RoHS=TRUE, trr Max (ns)=5
D2: library part CMP-2000-05285-1, "Ultra Low Capacitance Double Rail-to-Rail ESD Protection Diode, 5.5 V, 1 pF, -40 to 85 degC, 4-Pin SOT143B, RoHS, Tape and Reel", Capacitance Value=16pF, ESD Protection Voltage=8KV@ContactDisc, JLCPCBPartNum=C12333, Leakage Current=0.1uA, Manufacturer="NXP Semiconductors", Operating Temp Range=-40Cto85C, Operating Temperature Classification=Industrial, Operating Temperature Max Deg. C=85C, Operating Temperature Min Deg. C=-40C, Package / Case=SOT, Reverse Breakdown Voltage=6V, Reverse Stand-off Voltage=5.5V, Configuration=Quad, Datasheet URL=https://datasheet.ciiva.com/4479/prtr5v0u2x-102853-4479461.pdf, Datasheet Version="Rev. 02, 01/2008", Direction Type=Uni-Directional, Leakage Current (Max)=0.1uA, Manufacturer URL=http://www.nxp.com/, Mounting=SurfaceMount, Mounting Style=SurfaceMount, Number of Elements=1, Package Type=SOT, Packaging=TapeandReel, Pin Count=3+Tab, Polarity=Uni-Directional, Product Depth (mm)=1.4mm, Product Height (mm)=1mm, Product Length (mm)=3mm, Rad Hardened=No, Suppressor Type=DiodeArrays, Working Voltage=5.5V, Working Voltage (Max)=5.5V
D3: library part CMP-44529-000040-1, "LED GREEN CLEAR 2SMD", Case Code (Imperial)=0603, Case Code (Metric)=1608, Color=Green, Forward Voltage=2.65V, JLCPCBPartNum=C1322302, Lens Color=Colorless, Test Current=2mA, Case/Package=0603, Dominant Wavelength=525nm, Height=0.75mm, Length=1.6mm, Lens Transparency=Clear, Luminous Intensity=50mcd, Mount="Surface Mount", Packaging="Cut Tape", Viewing Angle=120°, Width=0.8mm
D4: library part CMP-12790-000046-1, "DIODE SCHOTTKY 80V 500MA SOD123", Capacitance=15pF, Forward Current=0.5A, JLCPCBPartNum=C177047, Manufacturer=Diodes, Max Junction Temp=+175°C, Max Repetitive Reverse Voltage=80V, Max Surge Forward Current=14A, Package=SOD123, Peak Reverse Current=0.5uA, Temperature="-55°C to +175°C", Temperature Range Low=-55°C, Automotive=No, Category=Diode, ComponentLink2Description=Datasheet, ComponentLink2URL=https://www.diodes.com/assets/Datasheets/MBR0580S1.pdf, Device Class L1="Discrete Semiconductors", Device Class L2=Diodes, Device Class L3="Schottky Diodes", Digikey Description="DIODE SCHOTTKY 80V 500MA SOD123", Footprint Url=https://www.diodes.com/assets/Package-Files/SOD123.pdf, Height=1.45mm, Lead Free=Yes, Manufacturer Part Number=MBR0580S1-7, Mouser Description="Schottky Diodes & Rectifiers SBR 0.5A 80Vrrm 14A Ifsm 80Vrrm 15pF", Octopart=https://octopart.com/mbr0580s1-7-diodes+inc.-53081572, Reverse Voltage=80V, RoHS=TRUE, Standoff Height=0mm, Temperature Range High=+175°C
F1: library part CMP-08605-000003-1, "FUSE BRD MNT 4A 125VAC/VDC 2SMD", Fuse Current=4A, JLCPCBPartNum=C206914, Manufacturer=Littelfuse, Max Fuse Ac Voltage=125V, Package=0154, Temperature="-55°C to +125°C", Temperature Range High=+125°C, Temperature Range Low=-55°C, Automotive=No, Category=Fuse, ComponentLink2Description=Datasheet, ComponentLink2URL=https://www.littelfuse.com/~/media/electronics/datasheets/fuses/littelfuse_fuse_154_154t_154l_154tl_datasheet.pdf.pdf, Device Class L1="Circuit Protection", Device Class L2=Fuses, Device Class L3=unset, Digikey Description="FUSE BRD MNT 4A 125VAC/VDC 2SMD", Fuse Blow Speed=Fast, Height=3.81mm, Lead Free=Yes, Manufacturer Part Number=0154004.DR, Max Fuse Dc Voltage=125V, Mouser Description="Surface Mount Fuses Fuseblock w/ fuse 4A OMNI BLOK 154", Octopart=https://octopart.com/0154004.dr-littelfuse-565861, RoHS=TRUE
FB1: library part CMP-03913-52738344-1, "74279221111 Ferrite Beads Multi-Layer High Current 110Ohm 25% 100MHz 5.4A 0.015Ohm DCR 1206 T/R", Case Code (Imperial)=1206, Case Code (Metric)=3216, Current Rating=5.4A, DC Resistance (DCR)=9.5mΩ, Max Operating Temperature=125°C, Min Operating Temperature=-55°C, Resistance=15mΩ, Test Frequency=100MHz, Tolerance=25%, Case/Package=1206, Height=1.1mm, Impedance=110Ω, Length=3.2mm, Max Current Rating=5.4A, Max DC Current=5.4A, Mount="Surface Mount", NexarPartId=52738344, Number of Lines=1, Packaging="Tape & Reel (TR)", REACH SVHC=Unknown, RoHS=Compliant, Termination=SMD/SMT, Weight=10.007382mg, Width=1.6mm
FB2: library part CMP-0686-00754-3, "Ferrite Bead, 1806, 60Ω @ 100MHz, 0.009Ω, 6A", Case Code (Imperial)=1806, Case Code (Metric)=4516, Current=6A, DC Resistance (DCR)=9mR, Frequency=100MHz, Inductor Type="FERRITE BEAD", JLCPCBPartNum=C85844, Manufacturer Series=BLM41P, Max Operating Temperature=125°C, Min Operating Temperature=-55°C, Package Quantity=1, Tolerance=25%, Case/Package=1806, Contact Plating=Tin, Core Material=Ferrite, Current Rating=6A, DC Current=6A, DC Resistance-Max=9mR, Depth=1.6mm, Height=1.6mm, Impedance=60R, Lead Free="Lead Free", Length=4.5mm, Material=Ferrite, Max Current Rating=6A, Max DC Current=6A, Military Standard=Not, Number of Circuits=1, Number of Functions=1, Number of Lines=1, Number of Pins=2, Packaging="Tape and Reel", Radiation Hardening=No, REACH SVHC="No SVHC", RoHS Compliant=Yes, Series=BLM41P, Shielding=Unshielded, Terminal Finish=Tin, Termination=SMD/SMT, Test Frequency=100MHz, Width=1.6mm
FB3: library part CMP-03913-52738340-1, "74279220601 Ferrite Beads Multi-Layer High Current 600Ohm 25% 100MHz 2.1A 0.08Ohm DCR 0805 Automotive T/R", Case Code (Imperial)=0805, Case Code (Metric)=2012, Current Rating=2.1A, DC Resistance (DCR)=43mΩ, Max Operating Temperature=125°C, Min Operating Temperature=-55°C, Test Frequency=100MHz, Tolerance=25%, Case/Package=0805, Height=900µm, Impedance=600Ω, Length=2mm, Max Current Rating=2.1A, Max DC Current=2.1A, Mount="Surface Mount", NexarPartId=52738340, Number of Lines=1, Packaging="Tape & Reel (TR)", REACH SVHC=Unknown, RoHS=Compliant, Termination=SMD/SMT, Weight=5.499807mg, Width=1.2mm
J2: library part MiniDin6_SMT, "Miniature circular connectors MP-371/S6", Digikey_PartNum=2057-MDP-006-ND
J3: library part MiniDin8_SMT, "Miniature circular connectors MP-371/S8", Digikey_PartNum=2057-MDP-008-ND
J4: library part 50-00621, "Tensility Connector, dc plug, 4.0x1.7x21.3 mm, dual solder tabs, spring contacts, nickel plated, 105 °C"
J5: library part CMP-207978-000003-2, "Conenctor USB 2.0 Type C Horizontal SMT", Current Rating=5A, Insulation Resistance=100MΩ, Max Operating Temperature=85°C, Min Operating Temperature=-40°C, Voltage Rating=20V, Contact Material="Gold, Nickel", Gender=Receptacle, Height=3.51mm, NexarPartId=129483980, Number of Contacts=12, Number of Pins=16, Packaging="Tape and Reel", Pin Length=950µm, RoHS=Compliant, USB Standard="USB 2.0"
J6: library part Socket, "Socket", LatestRevisionDate=17-Jul-2002, LatestRevisionNote="Re-released for DXP Platform.", Publisher="Altium Limited"
Q1: library part CMP-12801-000017-1, "MOSFET N-CH 100V 170MA SOT23-3", Continuous Drain Current=170mA, Drain To Source Breakdown Voltage=100V, Drain To Source Resistance=6Ω, Gate To Source Voltage=20V, Input Capacitace At Vds="22pF @ 25V", JLCPCBPartNum=C85107, Manufacturer="Diodes Incorporated", Max Forward Diode Voltage=1.3V, Max Junction Temp=+150°C, Package=SOT23, Power Dissipation=300mW, Pulse Drain Current=680mA, Temperature="-55°C to +150°C", Temperature Range Low=-55°C, Typ Forward Diode Voltage=0.84V, Automotive=No, Automotive Grade=NA, Category=Trans, ComponentLink2Description=Datasheet, ComponentLink2URL=https://www.diodes.com/assets/Datasheets/ds30366.pdf, Depletion Mode=False, Device Class L1="Discrete Semiconductors", Device Class L2=Transistors, Device Class L3=MOSFETs, Digikey Description="MOSFET N-CH 100V 170MA SOT23-3", Drain To Source Voltage=100V, Footprint Url=https://www.diodes.com/assets/Package-Files/SOT23.pdf, Height=1.1mm, Lead Free=Yes, Manufacturer Part Number=BSS123-7-F, Mouser Description="MOSFET 100V 360mW", Number Of Channels=1, Number Of N Channels=1, Octopart=https://octopart.com/bss123-7-f-diodes+inc.-335886, RoHS=TRUE, Rthja Max=417°C/W, Standoff Height=0.013mm, Temperature Range High=+150°C, Threshold Vgs Max=2V, Threshold Vgs Min=0.8V, Transconductance=0.37S, Turn Off Delay Time=13ns, Turn On Delay Time=8ns
Q2: library part CMP-07144-000014-1, "OPTOISOLTR 2.5KV 2CH DARL 8SOIC", Ambient Temperature Range High=+100°C, Ambient Temperature Range Low=-40°C, Collector Emitter Voltage=30V, Emiiter Collector Voltage=7V, Forward Current=1mA, Forward Voltage=1.08V, Isolation Voltage=2500Vrms, Manufacturer="ON Semiconductor", Max Junction Temp=+125°C, Min Current Transfer Ratio=500%, Package=751DZ, Power Dissipation=240mW, Reverse Voltage=6V, Temperature="-40°C to +125°C", Automotive=No, Category=Trans, ComponentLink2Description=Datasheet, ComponentLink2URL=https://www.onsemi.com/pub/Collateral/MOCD223M-D.PDF, Device Class L1=Optoelectronics, Device Class L2=Optocouplers, Device Class L3=unset, Digikey Description="OPTOISOLTR 2.5KV 2CH DARL 8SOIC", Footprint Url=https://www.onsemi.com/pub/Collateral/751DZ.PDF, Height=3.63mm, Ipc Land Pattern Name=SOIC127P594X363-8, Lead Free=Yes, Manufacturer Part Number=MOCD223M, Mouser Description="Optocoupler DC-IN 2-CH Darlington DC-OUT 8-Pin SOIC N Box (Alt: MOCD223M)", Octopart=https://octopart.com/mocd223m-on+semiconductor-84330512, RoHS=TRUE, Standoff Height=0.08mm, Temperature Range High=+125°C, Temperature Range Low=-40°C, Turn Off Delay Time=55us, Turn On Delay Time=10us
R1 R10 R12 R14: library part CMP-009-00226-17, "Resistor - 1500R - 1% - 50V - 62.5mW - 0402 - 100ppm - -40°C to 125°C", JLCPCBPartNum=C114759, Man-.Bonding=nein
R2 R3 R5 R8 R27 R28: library part CMP-009-00226-17, "Resistor - 27R - 1% - 50V - 62.5mW - 0402 - 100ppm - -40°C to 125°C", JLCPCBPartNum=C138021, Man-.Bonding=nein
R4: library part CMP-009-00226-17, "Resistor - 330R - 1% - 50V - 62.5mW - 0402 - 100ppm - -40°C to 125°C", JLCPCBPartNum=C105875, Man-.Bonding=nein
R6 R7 R9 R35 R36: library part CMP-009-00221-17, "Resistor - 10kR - 1% - 50V - 62.5mW - 100ppm - 0402 - -40°C to 125°C", JLCPCBPartNum=C144807, Man-.Bonding=no
R11: library part Res3, "Resistor", JLCPCBPartNum=C25804, LatestRevisionDate=29-May-2009, LatestRevisionNote="IPC-7351 Footprint Added.", PackageDescription="Chip Resistor", PackageReference=J1-0603, Published=8-Jun-2000, Publisher="Altium Limited"
R13 R26: library part Res3, "Resistor", JLCPCBPartNum=C22775, LatestRevisionDate=29-May-2009, LatestRevisionNote="IPC-7351 Footprint Added.", PackageDescription="Chip Resistor", PackageReference=J1-0603, Published=8-Jun-2000, Publisher="Altium Limited"
R23 R29 R30 R31: library part CMP-009-00209-21, "Resistor - 1kR - 1% - 50V - 62.5mW - 0402 - 100ppm - -40°C to 125°C", JLCPCBPartNum=C11702, Man-.Bonding=nein
R24 R25: library part Res3, "Resistor", JLCPCBPartNum=C192531, LatestRevisionDate=29-May-2009, LatestRevisionNote="IPC-7351 Footprint Added.", PackageDescription="Chip Resistor", PackageReference=J1-0603, Published=8-Jun-2000, Publisher="Altium Limited"
R32 R37: library part CMP-009-00211-15, "Resistor - 100k - 5% - 50V -62,5mW - 0402 - 200ppm - -55°C to 155°C", JLCPCBPartNum=C60491, Man-.Bonding=no
R33 R34: library part CMP-009-00226-17, "Resistor - 100R - 1% - 50V - 62.5mW - 0402 - 100ppm - -40°C to 125°C", JLCPCBPartNum=C106232, Man-.Bonding=nein
T1 T3: library part CMP-012-00000-1, "600 Impedance Primary Ohms 600 Impedance Secondary Ohms 1:1 Audio Transformer 200Hz ~ 4kHz Surface Mount", Case/Package=Tamura, JLCPCBPartNum=C840532, Availability=Unavailable, Component Type=Standard, Design Item ID=TTC-5023, MF=Tamura, MP=TTC-5023, Pins=4, Price=None, SnapEDA_Link=https://www.snapeda.com/parts/TTC-5023/Tamura/view-part/2878352/?ref=snap, Source=SnapEDAsch.SchLib
U1: library part CMP-002-000000-1, "USB Audio Codec improved on CM", JLCPCBPartNum=C371347, Package=None, Availability=Unavailable, Check_prices=https://www.snapeda.com/parts/CM108B/Cmedia/view-part/424266/?ref=eda, Component Type=Interface, Design Item ID=CM108B, MF=Cmedia, MP=CM108B, Pin Count=48, Price=None, SnapEDA_Link=https://www.snapeda.com/parts/CM108B/Cmedia/view-part/424266/?ref=snap, Source=CM108B.SchLib
U2: library part CMP-0309-00077-2, "2 / 3-Port Hub for USB with Optional Serial EEPROM Interface, 3.3V, 0 to 70 degC, 32-Pin LQFP (VF), Green (RoHS & no Sb/Br)", JLCPCBPartNum=C43665, Manufacturer="Texas Instruments", Supply Voltage(s)(V)=3.3, ComponentLink1Description=Datasheet, ComponentLink1URL=http://www.ti.com/general/docs/lit/getliterature.tsp?genericPartNumber=TUSB2036&fileType=pdf, ComponentLink2Description="Package Specification", ComponentLink2URL=http://www.ti.com/litv/pdf/mtqf002b, DatasheetVersion=SLLS372E, Eco-Plan="Green (RoHS & no Sb/Br)", Integrated MCU Architecture=N/A, Mounting Technology="Surface Mount", PackageDescription="32-Pin Plastic Quad Flatpack, 7 x 7 mm Body, 0.8 mm Pitch", PackageReference=VF0032A, PackageVersion="revD, Apr-2000", PartNumber=TUSB2036VF, SubFamily="USB Hub Controller", USB Full Speed=True, USB Speed=Full
U3: library part CMP-0337-00031-2, "Current-Limited Power-Distribution Switch, 0.5 A Current Limit, -40 to 85 degC, 8-pin SOIC (D), Green (RoHS & no Sb/Br)", Continuous Current(Max)(A)=0.25, Current Limit(A)=0.5, Manufacturer="Texas Instruments", Rating=Catalog, Code_JEDEC=MS-012AA, ComponentLink1Description=Datasheet, ComponentLink1URL=http://www.ti.com/general/docs/lit/getliterature.tsp?genericPartNumber=TPS2046B&fileType=pdf, DatasheetVersion=SLVS532C, Eco-Plan="Green (RoHS & no Sb/Br)", Enable="Active Low", Mounting Technology="Surface Mount", NEMKO=TRUE, Number of Switches=2, PackageDescription="8-Pin Plastic Small Outline Integrated Circuit, 4.9 x 3.9 mm, Pitch 1.27 mm Pitch", PackageReference=D0008A, PackageVersion="revM, Jun-2011", PartNumber=TPS2046BDR, rDS(on) per FET(Typ)(mOhms)=70, UL Listed=TRUE, Vin(Max)(V)=5.5, Vin(Min)(V)=2.7
U4: library part CMP-04917-000167-1, "IC REG LINEAR 5V 150MA 6SON", Dropout Voltage=960mV, Max Input Voltage=30V, Max Operating Temperature=125°C, Max Output Current=150mA, Min Current Limit=200mA, Min Input Voltage=2.7V, Min Operating Temperature=-40°C, Nominal Output Voltage=5V, Package Quantity=250, Power Supply Rejection Ratio (PSRR)=150dB, Quiescent Current=1uA, Accuracy=2%, Contact Plating=Gold, Lead Free="Lead Free", Mount="Surface Mount", Number of Outputs=1, Number of Pins=6, Number of Regulators=1, Output Current=150mA, Output Type=Fixed, Output Voltage=5V, Packaging="Tape and Reel", Polarity=Positive, Radiation Hardening=No, REACH SVHC="No SVHC", RoHS Compliant=Yes, Weight=0.000342oz
U5: library part CMP-04917-000167-1, "IC REG LINEAR 3.3V 150MA 6SON", Dropout Voltage=960mV, Max Input Voltage=30V, Max Operating Temperature=125°C, Max Output Current=150mA, Min Current Limit=200mA, Min Input Voltage=2.7V, Min Operating Temperature=-40°C, Nominal Output Voltage=3.3V, Package Quantity=250, Power Supply Rejection Ratio (PSRR)=150dB, Quiescent Current=1uA, Accuracy=2%, Contact Plating=Gold, Lead Free="Lead Free", Mount="Surface Mount", Number of Outputs=1, Number of Pins=6, Number of Regulators=1, Output Current=150mA, Output Type=Fixed, Output Voltage=3.3V, Packaging="Tape and Reel", Polarity=Positive, Radiation Hardening=No, REACH SVHC="No SVHC", RoHS Compliant=Yes, Weight=0.000342oz
U6: library part CMP-12113-000003-1, "IC USB CONTROLLER I2C 24QFN", Case/Package=QFN, Max Operating Temperature=105°C, Min Operating Temperature=-40°C, Interface=I2C, Packaging="Tape and Reel"
U7: library part CMP-04872-000022-1, "DGTL ISO 3000VRMS 2CH GP 8SOIC"
u8: library part CMP-2000-06288-1, "USB to Basic UART IC, 2.97 to 5.5 V, -40 to 85 degC, 16-Pin SSOP, RoHS", Interface Case Style=SSOP, JLCPCBPartNum=C69082, Manufacturer=FTDI, Operating Temperature Max=85°C, Operating Temperature Min=-40°C, Package Description="16-Pin Shrink Small Outline Package Integrated Circuit, Body 4.9 x 3.9 mm, Pitch 0.635 mm", Package Reference=SSOP-16, Supply Voltage Max=5.5V, Supply Voltage Min=2.97V, Data Rate=3Mbaud, Datasheet URL=http://www.ftdichip.com/Support/Documents/DataSheets/ICs/DS_FT230X.pdf, Datasheet Version="Rev. 1.4, 05/2016", Manufacturer URL=http://www.ftdichip.com/, Mounting Technology=SurfaceMount, MSL=MSL3-168hours, No. of Pins=16Pins, No. of Ports=-, Packaging=CutTape, Product Range=-, SVHC=NoSVHC(17-Dec-2015), USB Standard=USB2.0, USB Type=Transceiver
U10: library part CMP-0394-00563-2, "Single Output LDO, 150 mA, Fixed 3.3 V Output, 2.7 to 10 V Input, with Low IQ, 5-pin SOT-23 (DBV), -40 to 125 degC, Green (RoHS & no Sb/Br)", JLCPCBPartNum=C7100, Manufacturer="Texas Instruments", Accuracy(%)=3, Code_JEDEC=MO-178, ComponentLink1Description="Manufacturer URL", ComponentLink1URL=http://www.ti.com/, ComponentLink2Description=Datasheet, ComponentLink2URL=http://www.ti.com/general/docs/lit/getliterature.tsp?genericPartNumber=TPS76333&fileType=pdf, ComponentLink3Description="Package Specification", ComponentLink3URL=http://www.ti.com/litv/pdf/mpds018i, DatasheetVersion=SLVS181H, Eco-Plan="Green (RoHS & no Sb/Br)", Fixed Output Options(V)=3.3, Iout(Max)(A)=0.15, Iq(Typ)(mA)=0.08, Mounting Technology="Surface Mount", PackageDescription="5-Pin Plastic Small Outline, Body 1.60 Ãƒâ€” 2.90 mm, Pitch 0.95 mm", PackageReference=DBV0005A, PackageVersion=4073253-4/K, PartNumber=TPS76333DBVT, SubFamily="Single Channel LDO", Vdo(Typ)(mV)=300, Vin(Max)(V)=10, Vin(Min)(V)=2.7, Vout Adj(Max)(V)=3.3, Vout Adj(Min)(V)=3.3
Y1: library part CMP-06255-000002-1, "MEMS OSC XO 48.0000MHZ CMOS SMD", Ambient Temperature Range High=+85°C, Ambient Temperature Range Low=-40°C, Frequency=24MHz, JLCPCBPartNum=C1671481, Manufacturer=Microchip, Manufacturer Part Number=DSC6101MI2A-024.0000T, Max Junction Temp=+150°C, Max Supply Voltage=3.63V, Min Supply Voltage=1.71V, Package=C04-C04-1200, Temperature="to +150°C", Automotive=No, Category=Crys, ComponentLink2Description=Datasheet, ComponentLink2URL=http://ww1.microchip.com/downloads/en/DeviceDoc/20005624B.pdf, Device Class L1="Passive Components", Device Class L2="Crystals / Oscillators", Device Class L3=Oscillators, Digikey Description="MEMS OSC XO 24.0000MHZ CMOS SMD", Footprint Url=http://ww1.microchip.com/downloads/en/DeviceDoc/04L_VFLGA_2-0x1-6x0-89_ASA_C04-01200b.pdf, Height=0.89mm, Lead Free=Yes, Mouser Description="Ultra-Low Power, Mems Oscillator, 2016, -40 To 85, 25Ppm4 Vflga 2.0X1.6X0.89Mm T/R", Octopart=https://octopart.com/dsc6101mi2a-024.0000t-microchip-75516980, RoHS=TRUE, Series=DSC61, Stability=25ppm, Standoff Height=0mm, Temperature Range High=+150°C

## Free pads (board coordinates)
  round 10 hole 10 paste-2539.97: 099(17.045,8.751)
  oval 5.08x2.54 hole 2.54 slot 5.08 at 0 deg: 100(54.245,32.351) 100(72.245,4.351)
  round 1.152 hole 1.152 unplated mask+0.148: Assembly1(12.492,2.438) Assembly2(115.75,34.25)

## Via types
v1: diameter 0.762, hole 0.3, Top Layer to Bottom Layer, tented both sides, 200 vias
v2: diameter 0.5, hole 0.2, Top Layer to Bottom Layer, 4 vias